# Altium PCB DB30.PcbDoc (part 4 of 8)
Units mil, origin at the board's own origin, x right, y up, seen from the top; angles counter-clockwise.
Board outline 3236.22 x 4456.69 mil, 8 copper layers (Top Layer, MidLayer1, MidLayer2, GND-Layer5, MidLayer3, VCC, MidLayer4, Bottom Layer), stack 61.8 mil thick; 219 components, 472 nets, 1811 pads, 1561 vias.
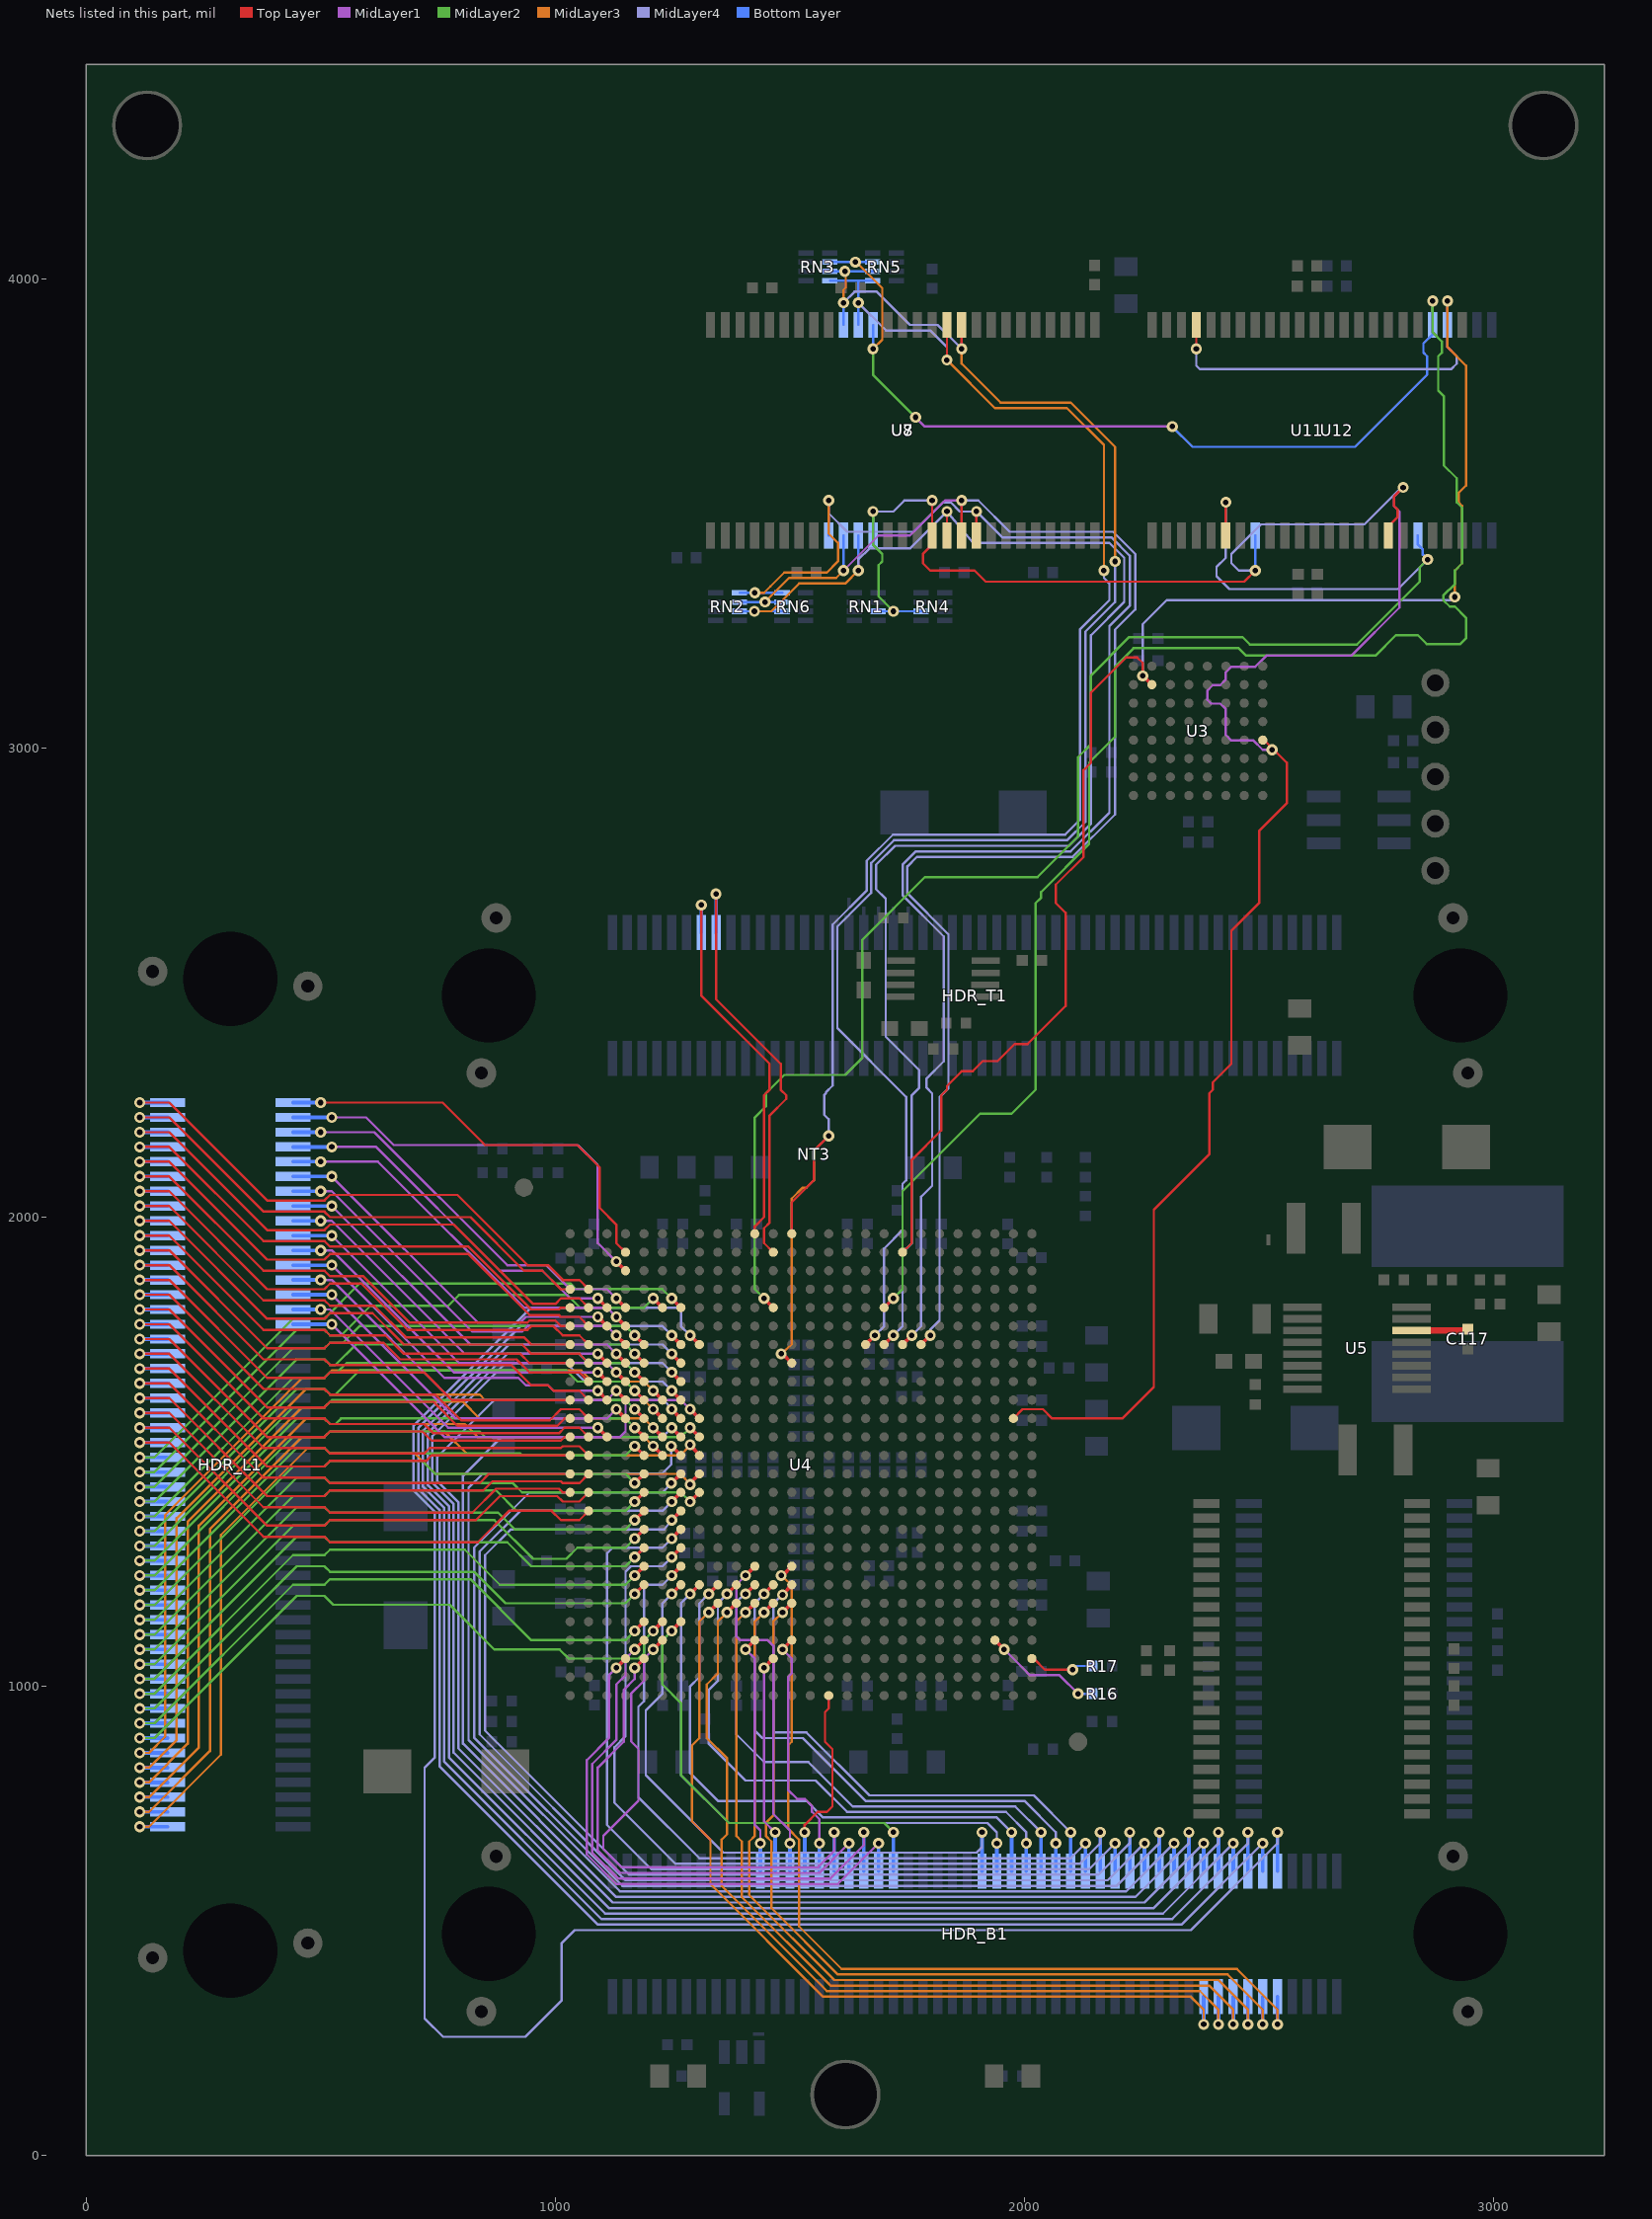
[diagram p10: the nets of this part, all layers, seen from the top]

## Via types
v1: diameter 23.62, hole 11.81, Top Layer to Bottom Layer, 944 vias
v2: diameter 23.62, hole 11.81, Top Layer to Bottom Layer, tented both sides, 477 vias
v3: diameter 27.56, hole 15.75, Top Layer to Bottom Layer, 139 vias
v4: diameter 23.62, hole 11.81, Top Layer to Bottom Layer, tented top, 1 vias

## Nets (pads, with @x,y where several pads share a name; then routed paths per layer and width w, separated by ;. In a path a pad name is that pad's centre, name@x,y a point inside that pad or via, vN(x,y) a via of type N, cw(c..) or ccw(c..) an arc to the next point about the centre after c; other vN are vias at no path point) (continued)
BUS_NBE3: RN3.6 RN5.7 U4.E18 U8.39 U12.40 | length 5096.7
  Top Layer w7.87: U4.E18@1700.79,1807.09 v1(1720.47,1826.77)
  MidLayer1 w5: v2(1767.72,3704.72) 1787.4,3685.04 v2(2314.96,3685.04)
  MidLayer2 w5: v2(1677.17,3850.39) 1677.17,3795.28 v2(1767.72,3704.72) ; v1(1720.47,1826.77) 1740.16,1846.46 1740.16,2027.56 1740.16,2039.37 1740.16,2055.12 1905.51,2220.47 1972.44,2220.47 2023.62,2271.65 2023.62,2669.29 2035.43,2681.1 2035.43,2692.91 2137.8,2795.28 2137.8,2968.5 2192.91,3023.62 2192.91,3173.23 2232.28,3212.6 2456.69,3212.6 2472.44,3196.85 2748.03,3196.85 2791.34,3240.16 2838.58,3240.16 2857.28,3221.46 2929.13,3221.46 2940.94,3233.27 2940.94,3277.56 2917.32,3301.18 2906.5,3301.18 2892.72,3314.96 2892.72,3324.8 2917.32,3349.41 2917.32,3377.95 2933.07,3393.7 2933.07,3511.81 2921.26,3523.62 2921.26,3574.8 2893.7,3602.36 2893.7,3750 2881.89,3761.81 2881.89,3834.65 2889.76,3842.52 2889.76,3866.14 2870.08,3885.83 v2(2870.08,3952.76)
  MidLayer3 w5: v1@1641.54,4035.43 1696.85,3980.12 1696.85,3870.08 v2(1677.17,3850.39)
  Bottom Layer w5: RN3.6@1586.22,4035.43 RN5.7@1677.56,4035.43 ; v2(1677.17,3850.39) U8.39@1677.17,3901.57 ; v2(2314.96,3685.04) 2358.27,3641.73 2704.72,3641.73 2858.27,3795.28 2858.27,3834.65 2850.39,3842.52 2850.39,3862.2 2870.08,3881.89 v2(2870.08,3952.76)
  other v1: 1639.78,4035.43
BUS_NOE: U3.G2 U4.B19 U11.41 U12.41 | length 3948.6
  Top Layer w5: U4.B19@1740.16,1925.2 1759.84,1944.88 1759.84,2027.56 1759.84,2039.37 1759.84,2122.05 1822.83,2185.04 1822.83,2259.84 1834.64,2271.65 1834.64,2279.53 1866.14,2311.02 1889.76,2311.02 1911.17,2332.43 1942.66,2332.43 1978.9,2368.66 2006.46,2368.66 2087.6,2449.8 2087.6,2648.62 2066.93,2669.29 2066.93,2708.66 2125.98,2767.72 2125.98,2952.76 2141.73,2968.5 2141.73,3118.11 2216.54,3192.91 2240.16,3192.91 2251.97,3181.1 v1@2251.97,3154.53 ; v1@2255.91,3150.59 v1@2255.91,3154.53 ; v2(2366.14,3850.39) U11.41@2366.14,3901.57
  Top Layer w7.87: v1@2251.97,3154.53 U3.G2@2271.65,3134.84
  MidLayer3 w5: v2(2901.58,3952.76) 2901.57,3854.33 2940.94,3814.96 2940.94,3559.06 2925.2,3543.31 2925.2,3523.62 2933.07,3515.75 2933.07,3393.7 2917.32,3377.95 2917.32,3314.96 v1(2917.32,3321.85)
  MidLayer4 w5: v1(2251.97,3153.54) 2251.97,3263.78 2303.15,3314.96 2907.48,3314.96 v1(2917.32,3321.85) ; v2(2366.14,3850.39) 2366.14,3814.96 2374.02,3807.09 2909.45,3807.09 2921.26,3818.9 2921.26,3834.65 2901.58,3854.33 v2(2901.58,3952.76)
  Bottom Layer w5: U12.41@2901.57,3901.57 v2(2901.58,3952.76)
BUS_NWE: RN1.7 RN4.6 U3.A5 U4.L25 U7.16 U8.16 U11.17 U12.17 | length 4955.5
  Top Layer w5: U7.16@1803.14,3452.75 v2(1803.14,3527.55) ; U7.16@1803.15,3460.62 1803.15,3433.07 1783.46,3413.39 1783.46,3393.7 1799.21,3377.95 1893.7,3377.95 1917.32,3354.33 2468.5,3354.33 v1(2492.13,3377.95) ; U4.L25@1976.38,1570.87 1996.06,1590.55 2039.37,1590.55 2059.06,1570.87 2078.74,1570.87 2094.49,1570.87 2208.66,1570.87 2275.59,1637.8 2275.59,2015.75 2393.7,2133.86 2393.7,2263.78 2401.57,2271.65 2401.57,2287.4 2440.94,2326.77 2440.94,2610.24 2500,2669.29 2500,2822.83 2559.06,2881.89 2559.06,2968.5 2510.82,3016.74 U3.A5@2507.87,3016.73 ; U11.17@2775.59,3452.76 2775.59,3472.44 2795.28,3492.13 2795.28,3507.87 2787.4,3515.75 2787.4,3535.43 v1(2807.09,3555.12)
  MidLayer1 w5: v1(2527.56,2996.06) 2507.87,2996.06 2488.19,3015.75 2440.94,3015.75 2429.13,3027.56 2429.13,3082.68 2417.32,3094.49 2397.64,3094.49 2389.76,3102.36 2389.76,3122.05 2401.57,3133.86 2417.32,3133.86 2429.13,3145.67 2429.13,3161.42 2440.94,3173.23 2492.13,3173.23 2515.75,3196.85 2696.85,3196.85 2799.21,3299.21 2799.21,3503.94 2787.4,3515.75 2787.4,3535.43 v1(2807.09,3555.12)
  MidLayer2 w5: v2(1677.17,3503.94) 1677.17,3433.07 1696.85,3413.39 1696.85,3397.64 1688.98,3389.76 1688.98,3322.83 v1(1720.47,3291.34)
  MidLayer4 w5: v2(1677.17,3503.94) 1720.47,3503.94 1744.09,3527.55 v2(1803.14,3527.55) ; v1(2492.13,3377.95) 2456.69,3377.95 2440.94,3393.7 2440.94,3413.39 2503.94,3476.38 2724.41,3476.38 v1@2805.12,3557.09
  Bottom Layer w5: U8.16@1677.17,3452.76 v2(1677.17,3503.94) ; RN1.7@1688.18,3291.34 RN4.6@1779.53,3291.34 RN4.6@1779.92,3291.34 ; v1(2492.13,3377.95) U12.17@2492.13,3452.76
BUS_SDRAM_CKE: RN3.7 RN5.6 U4.G17 U7.37 U8.37 | length 3474.1
  Top Layer w5: v2(1866.14,3850.39) U7.37@1866.14,3901.57
  Top Layer w7.87: U4.G17@1661.42,1728.35 v1(1681.1,1748.03)
  MidLayer3 w5: v2(1614.17,3948.82) 1614.17,3976.38 1618.9,3981.11 v1@1618.9,4015.75 ; v2(1866.14,3850.39) 1866.14,3818.9 1948.82,3736.22 2098.43,3736.22 2192.91,3641.73 v1(2192.91,3397.64)
  MidLayer4 w5: v2(1614.17,3948.82) 1637.8,3972.44 1685.04,3972.44 1755.91,3901.57 1814.96,3901.57 v2(1866.14,3850.39) ; v1(1681.1,1748.03) 1700.79,1767.72 1700.79,1933.07 1740.16,1972.44 1740.16,2027.56 1740.16,2043.31 1740.16,2070.87 1748.03,2078.74 1748.03,2255.91 1601.2,2402.74 1601.2,2619.25 1673.05,2691.1 1673.5,2691.1 1673.5,2754.96 1721.69,2803.15 2090.55,2803.15 2129.92,2842.52 2129.92,3248.03 2192.91,3311.02 v1(2192.91,3397.64)
  Bottom Layer w5: RN3.7@1586.22,4015.75 RN5.6@1676.19,4015.75 RN5.6@1677.56,4015.75 ; U8.37@1614.17,3901.57 v2(1614.17,3948.82)
  other v1: 1617.14,4015.75
BUS_SDRAM_CLK: NT3.2 RN3.8 RN5.5 U4.H13 U7.38 U8.38 | length 3458.8
  Top Layer w5: NT3.2@1551.18,2141.73 1562.99,2153.54 v1(1582.68,2173.23) ; v2(1834.64,3826.77) U7.38@1834.65,3901.57
  Top Layer w7.87: v1@1484.25,1708.66 U4.H13@1503.94,1688.98
  MidLayer3 w5: v1(1481.3,1708.66) 1503.94,1728.35 1503.94,2027.56 1503.94,2039.37 1527.56,2062.99 1535.43,2062.99 1551.18,2078.74 1551.18,2141.73 v1(1582.68,2173.23) ; v2(1834.64,3826.77) 1937,3724.41 2090.55,3724.41 2169.29,3645.67 v1(2169.29,3377.95)
  MidLayer4 w5: v1(1582.68,2173.23) 1582.68,2208.66 1573,2218.34 1573,2260.09 1576.99,2264.08 1576.99,2266.23 1591.2,2280.43 1591.2,2623.39 1663.5,2695.69 1663.5,2759.1 1719.36,2814.96 2086.61,2814.96 2118.11,2846.46 2118.11,3251.97 2181.1,3314.96 2181.1,3350.39 2169.29,3362.2 v1(2169.29,3377.95) ; v2(1645.67,3948.82) 1704.72,3889.76 1799.21,3889.76 1834.64,3854.34 v2(1834.64,3826.77)
  Bottom Layer w5: RN3.8@1586.22,3996.06 RN5.5@1677.56,3996.06 ; U8.38@1645.67,3901.57 1645.67,3996.06
BUS_SDRAM_FEEDBACK: NT3.1 U4.A13 | length 181
  Top Layer w5: U4.A13@1503.94,1964.57 1503.94,2031.5 1551.18,2078.74 NT3.1@1551.18,2125.98
BUS_SDRAM_NCAS: RN2.7 RN6.6 U4.G18 U7.17 U8.17 | length 3334.5
  Top Layer w5: U7.17@1834.65,3452.76 1834.64,3499.99 v1(1834.65,3503.94)
  Top Layer w7.87: U4.G18@1700.79,1728.35 v1(1720.47,1748.03)
  MidLayer3 w5: v1(1424.23,3291.34) 1460.63,3291.34 1519.68,3350.39 1618.11,3350.39 v2(1645.67,3377.95)
  MidLayer4 w5: v2(1645.67,3377.95) 1645.67,3401.57 1669.29,3425.2 1755.91,3425.2 v1(1834.65,3503.94) 1890.42,3437.01 2181.1,3437.01 2212.6,3405.51 2212.6,3311.02 2141.73,3240.16 2141.73,2838.58 2094.49,2791.34 1724.02,2791.34 1683.5,2750.82 1683.5,2699.24 1704.26,2678.48 1704.26,2384.54 1775.59,2313.21 1775.59,2275.59 1759.84,2259.84 1759.84,2043.31 1759.84,2027.56 1759.84,1944.88 1740.16,1925.2 1740.16,1767.72 v1(1720.47,1748.03)
  Bottom Layer w5: RN2.7@1393.3,3291.34 RN6.6@1483.28,3291.34 RN6.6@1484.64,3291.34 ; v2(1645.67,3377.95) U8.17@1645.67,3452.76
BUS_SDRAM_NCS: RN2.5 RN6.8 U4.G19 U7.19 U8.19 | length 3476.3
  Top Layer w5: U7.19@1897.64,3452.76 v2(1897.63,3503.93)
  Top Layer w7.87: U4.G19@1740.16,1728.35 v1(1759.84,1748.03)
  MidLayer3 w5: v1(1425.2,3330.71) 1444.88,3330.71 1458.54,3344.36 1488.19,3374.02 1578.74,3374.02 1602.36,3397.64 1602.36,3437.01 1582.68,3456.69 v2(1582.68,3527.56)
  MidLayer4 w5: v2(1582.68,3527.56) 1582.68,3500 1622.05,3460.63 1763.78,3460.63 1826.77,3523.62 1842.52,3523.62 1862.21,3503.93 v2(1897.63,3503.93) 1952.76,3448.82 2185.04,3448.82 2224.41,3409.45 2224.41,3303.15 2181.1,3259.84 2181.1,2862.2 2098.43,2779.53 1768.23,2779.53 1740.3,2751.6 1740.3,2685.86 1827.88,2598.27 1827.88,2332.12 1791.34,2295.57 1791.34,2275.59 1803.15,2263.78 1803.15,2066.93 1779.53,2043.31 1779.53,2027.56 1779.53,1767.72 v1(1759.84,1748.03)
  Bottom Layer w5: RN2.5@1393.31,3330.71 RN6.8@1483.28,3330.71 RN6.8@1484.26,3330.71 ; U8.19@1582.68,3452.76 v2(1582.68,3527.56)
BUS_SDRAM_NRAS: RN2.6 RN6.7 U4.G20 U7.18 U8.18 | length 3317.2
  Top Layer w5: U7.18@1866.14,3452.76 v1(1866.14,3527.55)
  Top Layer w7.87: U4.G20@1779.53,1728.35 v1(1799.21,1748.03)
  MidLayer1 w5: v2(1614.17,3377.95) 1688.98,3452.76 1755.91,3452.76 1830.7,3527.55 v1(1866.14,3527.55)
  MidLayer3 w5: v1(1446.86,3311.02) 1498.05,3362.2 1598.43,3362.2 v2(1614.17,3377.95)
  MidLayer4 w5: v1(1799.21,1748.03) 1799.21,1760.01 1818.9,1779.7 1818.9,2027.56 1818.9,2043.31 1818.9,2255.91 1837.88,2274.89 1837.88,2602.42 1750.3,2690 1750.3,2747.46 1770.56,2767.72 2102.36,2767.72 2192.91,2858.27 2192.91,3251.97 2236.22,3295.28 2236.22,3413.39 2188.98,3460.63 1968.5,3460.63 1901.58,3527.55 v1(1866.14,3527.55) v1@1858.27,3531.5
  Bottom Layer w5: RN2.6@1393.3,3311.02 RN6.7@1483.28,3311.03 RN6.7@1484.64,3311.02 ; v2(1614.17,3377.95) U8.18@1614.17,3452.76
BUS_SRAM_NCS: U4.E12 U11.6 U12.6 | length 3511.7
  Top Layer w5: U11.6@2429.13,3452.76 2429.13,3503.94 v2(2429.13,3523.62)
  Top Layer w7.87: v1(1444.88,1826.77) U4.E12@1464.57,1807.09
  MidLayer2 w5: v1(1444.88,1826.77) 1425.2,1846.46 1425.2,2027.56 1425.2,2039.37 1425.2,2212.6 1448.82,2236.22 1448.82,2244.09 1448.82,2263.78 1488.19,2303.15 1618.11,2303.15 1654.53,2339.57 1654.53,2591.54 1787.4,2724.41 2027.56,2724.41 2114.17,2811.02 2114.17,2980.32 2141.73,3007.87 2141.73,3154.53 2223.42,3236.22 2464.57,3236.22 2480.32,3220.47 2708.66,3220.47 2842.52,3354.33 2842.52,3384.83 v2(2859.27,3401.57)
  MidLayer4 w5: v2(2429.13,3523.62) 2429.13,3405.51 2409.45,3385.83 2409.45,3366.14 2437.01,3338.58 2796.28,3338.58 v2(2859.27,3401.57)
  Bottom Layer w5: U12.6@2838.58,3452.76 2838.58,3433.42 2848.92,3423.08 2848.92,3411.92 v2(2859.27,3401.57)
BUZZER: HDR_B1.40 U4.AB7 | length 945.4
  Top Layer w7.87: v1(1248.03,1118.11) U4.AB7@1267.72,1137.8
  MidLayer2 w5: v1(1248.03,1118.11) 1228.35,1098.42 1228.35,1003.94 1267.72,964.57 1267.72,917.32 1267.72,905.51 1267.72,811.02 1370.08,708.66 1700.79,708.66 v2(1720.47,688.98)
  Bottom Layer w7.87: HDR_B1.40@1720.48,606.3 v2(1720.47,688.98)
CAN_RXD: HDR_T1.14 U4.A11 | length 833.2
  Top Layer w5: v2(1311.02,2665.35) 1311.02,2472.44 1456.69,2326.77 1456.69,2271.65 1444.88,2259.84 1444.88,2062.99 1444.88,2039.37 1444.88,2027.56 1444.88,2000 1425.2,1980.31 U4.A11@1425.2,1964.57
  Bottom Layer w7.87: HDR_T1.14@1311.02,2606.3 v2(1311.02,2665.35)
CAN_TXD: HDR_T1.16 U4.B12 | length 936.1
  Top Layer w5: v2(1342.52,2688.98) 1342.52,2464.57 1480.31,2326.77 1480.31,2271.65 1492.13,2259.84 1492.13,2251.97 1456.69,2216.54 1456.69,2039.37 1456.69,2027.56 1456.69,1988.19 1444.88,1976.38 1444.88,1944.88 U4.B12@1464.57,1925.2
  Bottom Layer w7.87: HDR_T1.16@1342.52,2606.3 v2(1342.52,2688.98)
CCLK: R17.2 U4.AD26 | length 152.6
  Top Layer w5: U4.AD26@2015.75,1059.05 2019.69,1059.05 2043.31,1035.43 v1(2102.36,1035.43)
  Bottom Layer w5: v1(2102.36,1035.43) 2110.24,1043.31 R17.2@2144.17,1043.31 R17.2@2136.3,1035.43
COMP: C117.2 U5.6 | length 121.4
  Top Layer w13.78: U5.6@2824.58,1758.25 2942.3,1758.25 C117.2@2944.88,1760.82
DAU_RESET_SW: HDR_B1.38 U4.AD4 | length 1194.6
  Top Layer w7.87: v1(1129.92,1039.37) U4.AD4@1149.61,1059.05
  MidLayer1 w5: v1(1129.92,1039.37) 1114.17,1023.62 1114.17,917.32 1114.17,905.51 1114.17,889.76 1066.93,842.52 1066.93,641.73 1129.92,578.74 1602.36,578.74 v2(1688.98,665.35)
  Bottom Layer w7.87: HDR_B1.38@1688.98,606.3 v2(1688.98,665.35)
DAU_TFT_BLIGHT: HDR_B1.91 U4.W13 | length 1982.9
  Top Layer w7.87: v1@1484.25,1236.22 U4.W13@1503.94,1255.91
  MidLayer3 w5: v1(1481.3,1236.22) 1503.94,1216.54 1503.94,917.32 1503.94,905.51 1503.94,881.89 1496.06,874.02 1496.06,696.85 1519.68,673.23 1519.68,488.19 1610.24,397.64 2452.76,397.64 2539.37,311.02 v2(2539.37,279.53)
  Bottom Layer w7.87: v2(2539.37,279.53) HDR_B1.91@2539.37,338.58
DAU_TFT_BLUE0: HDR_B1.62 U4.Y12 | length 1141.4
  Top Layer w7.87: v1(1444.88,1196.85) U4.Y12@1464.57,1216.54
  MidLayer4 w5: v1(1444.88,1196.85) 1425.19,1177.16 1425.19,917.32 1425.2,905.51 1440.94,889.76 1527.56,889.76 1661.42,755.91 2000,755.91 2066.93,688.98 v2(2066.93,665.35)
  Bottom Layer w7.87: HDR_B1.62@2066.93,606.3 v2(2066.93,665.35)
DAU_TFT_BLUE1: HDR_B1.64 U4.Y13 | length 1133.6
  Top Layer w7.87: v1(1484.25,1194.88) U4.Y13@1503.94,1216.54
  MidLayer4 w5: v1(1484.25,1194.88) 1464.57,1177.16 1464.57,917.32 1464.57,905.51 1468.5,901.57 1535.43,901.57 1669.29,767.72 2019.68,767.72 v2(2098.42,688.98)
  Bottom Layer w7.87: v2(2098.42,688.98) HDR_B1.64@2098.43,606.3
DAU_TFT_BLUE2: HDR_B1.66 U4.W7 | length 1626.8
  Top Layer w7.87: v1(1248.03,1236.22) U4.W7@1267.72,1255.91
  MidLayer4 w5: v1(1248.03,1236.22) 1228.34,1216.53 1196.85,1216.53 1188.98,1208.66 1188.98,968.5 1177.17,956.69 1177.17,917.32 1177.17,905.51 1177.17,763.78 1307.09,633.86 2098.43,633.86 v2(2129.92,665.35)
  Bottom Layer w7.87: HDR_B1.66@2129.92,606.3 v2(2129.92,665.35)
DAU_TFT_BLUE3: HDR_B1.68 U4.V7 | length 1854.7
  Top Layer w7.87: v1(1248.03,1275.59) U4.V7@1267.72,1295.28
  MidLayer4 w5: v1(1248.03,1275.59) 1228.34,1255.9 1161.42,1255.9 1149.61,1244.09 1149.61,917.32 1149.61,905.51 1149.61,893.7 1125.98,870.08 1125.98,751.97 1255.91,622.05 2118.11,622.05 2161.42,665.35 v2(2161.42,688.98)
  Bottom Layer w7.87: HDR_B1.68@2161.42,606.3 v2(2161.42,688.98)
DAU_TFT_BLUE4: HDR_B1.70 U4.U7 | length 1961.1
  Top Layer w7.87: v1(1248.03,1314.96) U4.U7@1267.72,1334.65
  MidLayer4 w5: v1(1248.03,1314.96) 1228.35,1295.28 1122.05,1295.28 1110.24,1283.46 1110.24,917.32 1110.24,905.51 1110.24,704.72 1204.72,610.24 2137.8,610.24 v2(2192.91,665.35)
  Bottom Layer w7.87: HDR_B1.70@2192.92,606.3 v2(2192.91,665.35)
DAU_TFT_CL1: HDR_B1.88 U4.H7 | length 3391.7
  Top Layer w7.87: v1(1248.03,1708.66) U4.H7@1267.72,1688.98
  MidLayer4 w5: v1(1248.03,1708.66) 1228.34,1728.35 968.5,1728.35 956.69,1728.35 901.57,1728.35 717.9,1544.67 717.9,1425.57 763.15,1380.32 763.15,839.21 1098.43,503.94 2314.96,503.94 2476.38,665.35 v2(2476.38,688.98)
  Bottom Layer w7.87: HDR_B1.88@2476.38,606.3 v2(2476.38,688.98)
DAU_TFT_CL2: HDR_B1.90 U4.G7 | length 3490.1
  Top Layer w7.87: v1(1248.03,1748.03) U4.G7@1267.72,1728.35
  MidLayer4 w5: v1(1248.03,1748.03) 1228.34,1767.72 968.51,1767.72 956.69,1767.72 925.2,1767.72 707.9,1550.42 707.9,1421.43 753.15,1376.18 753.15,829.53 1090.55,492.13 2334.65,492.13 v2(2507.87,665.35)
  Bottom Layer w7.87: v2(2507.87,665.35) HDR_B1.90@2507.88,606.3 v2(2507.87,665.35)
DAU_TFT_CL3: HDR_B1.92 U4.G8 | length 4238.6
  Top Layer w7.87: v1(1287.4,1748.03) U4.G8@1307.09,1728.35
  MidLayer4 w5: v1(1287.4,1748.03) 1267.71,1767.72 1267.71,1799.21 1259.84,1807.09 968.5,1807.09 956.69,1807.09 948.82,1807.09 697.9,1556.17 697.9,1417.29 743.15,1372.04 743.15,848.46 721.46,826.77 721.46,292.32 760.83,252.95 936.02,252.95 1013.78,330.71 1013.78,452.76 1041.34,480.32 2354.33,480.32 2539.37,665.35 v2(2539.37,688.98)
  Bottom Layer w7.87: HDR_B1.92@2539.37,606.3 v2(2539.37,688.98)
DAU_TFT_DISP_ON: HDR_B1.89 U4.AA13 | length 1904.8
  Top Layer w7.87: v1(1484.25,1157.48) U4.AA13@1503.94,1177.17
  MidLayer3 w5: v1(1484.25,1157.48) 1464.57,1137.79 1464.57,917.32 1464.57,905.51 1464.57,724.41 1448.82,708.66 1448.82,681.1 1460.63,669.29 1460.63,527.56 1602.36,385.83 2433.07,385.83 2507.87,311.02 v2(2507.88,279.53)
  Bottom Layer w7.87: v2(2507.88,279.53) HDR_B1.89@2507.88,338.58
DAU_TFT_GREEN0: HDR_B1.72 U4.T7 | length 2467
  Top Layer w7.87: v1(1248.03,1354.33) U4.T7@1267.72,1374.02
  MidLayer4 w5: v1(1248.03,1354.33) 1232.28,1334.65 1078.74,1334.64 968.5,1334.64 956.69,1334.65 905.51,1334.65 850.39,1279.53 850.39,905.51 1157.48,598.43 2157.48,598.43 2224.41,665.36 v2(2224.41,688.98)
  Bottom Layer w7.87: HDR_B1.72@2224.41,606.3 v2(2224.41,688.98)
DAU_TFT_GREEN1: HDR_B1.74 U4.R7 | length 2508.9
  Top Layer w7.87: v1(1248.03,1393.7) U4.R7@1267.72,1413.39
  MidLayer4 w5: v1(1248.03,1393.7) 1228.34,1374.01 1059.06,1374.01 968.5,1374.01 956.69,1374.02 925.2,1374.02 838.58,1287.4 838.58,897.64 1149.61,586.61 2177.16,586.61 v2(2255.9,665.35)
  Bottom Layer w7.87: HDR_B1.74@2255.91,606.3 v2(2255.9,665.35)
DAU_TFT_GREEN2: HDR_B1.76 U4.P7 | length 2646
  Top Layer w7.87: v1@1248.03,1433.07 U4.P7@1267.72,1452.76
  MidLayer4 w5: v1@1248.03,1433.07 1247.54,1432.58 1228.34,1413.38 968.5,1413.39 956.69,1413.39 944.88,1413.39 826.77,1295.28 826.77,890.75 1142.72,574.8 2196.85,574.8 2287.4,665.35 v2(2287.4,688.98)
  Bottom Layer w7.87: HDR_B1.76@2287.41,606.3 v2(2287.4,688.98)
  other v1: 1247.05,1433.07
DAU_TFT_GREEN3: HDR_B1.78 U4.N7 | length 2796.4
  Top Layer w7.87: v1@1248.03,1511.81 U4.N7@1267.72,1492.13
  MidLayer4 w5: v1(1247.05,1511.81) 1247.05,1473.05 1227,1453 844.96,1453 814.96,1423 814.96,885.83 1137.8,562.99 2216.53,562.99 v2(2318.9,665.35) ; v1@1247.54,1512.3 v1@1248.03,1511.81
  Bottom Layer w7.87: HDR_B1.78@2318.9,606.3 v2(2318.9,665.35)
DAU_TFT_GREEN4: HDR_B1.80 U4.M7 | length 2922.2
  Top Layer w7.87: v1(1248.03,1551.18) U4.M7@1267.72,1531.5
  MidLayer4 w5: v1(1248.03,1551.18) 1228.34,1531.5 885.83,1531.5 803.15,1448.82 803.15,877.95 1129.92,551.18 2236.22,551.18 2350.39,665.35 v2(2350.39,688.98)
  Bottom Layer w7.87: HDR_B1.80@2350.4,606.3 v2(2350.39,688.98)
DAU_TFT_GREEN5: HDR_B1.82 U4.L7 | length 3062.8
  Top Layer w7.87: v1(1248.03,1590.55) U4.L7@1267.72,1570.87
  MidLayer4 w5: v1(1248.03,1590.55) 1232.28,1610.24 1078.74,1610.24 968.5,1610.24 956.69,1610.24 870.08,1610.24 747.9,1488.06 747.9,1438 793.15,1392.75 793.15,868.27 1122.05,539.37 2255.9,539.37 v2(2381.89,665.35)
  Bottom Layer w7.87: HDR_B1.82@2381.89,606.3 v2(2381.89,665.35)
DAU_TFT_IRQ: HDR_B1.81 U4.AA9 | length 1890.2
  Top Layer w7.87: v1(1326.77,1157.48) U4.AA9@1346.46,1177.17
  MidLayer3 w5: v1(1326.77,1157.48) 1307.08,1137.79 1307.09,917.32 1307.09,905.51 1307.09,889.76 1291.34,874.02 1291.34,712.6 1330.71,673.23 1330.71,578.74 1570.87,338.58 2354.33,338.58 2381.89,311.02 v2(2381.89,279.53)
  Bottom Layer w7.87: v2(2381.89,279.53) HDR_B1.81@2381.89,338.58
DAU_TFT_M: HDR_B1.87 U4.AA12 | length 1897.9
  Top Layer w7.87: v1(1444.88,1157.48) U4.AA12@1464.57,1177.17
  MidLayer3 w5: v1(1444.88,1157.48) 1425.2,1137.79 1425.2,917.32 1425.2,905.51 1425.2,681.1 1413.39,669.29 1413.39,555.12 1594.49,374.02 2413.39,374.02 2476.38,311.02 v2(2476.38,279.53)
  Bottom Layer w7.87: v2(2476.38,279.53) HDR_B1.87@2476.38,338.58
DAU_TFT_MUX: HDR_B1.85 U4.AA11 | length 1884.5
  Top Layer w7.87: v1(1405.51,1157.48) U4.AA11@1425.2,1177.17
  MidLayer3 w5: v1(1405.51,1157.48) 1385.83,1137.79 1385.83,917.32 1385.83,905.51 1385.83,681.1 1397.64,669.29 1397.64,551.18 1586.61,362.2 2393.7,362.2 2444.88,311.02 v2(2444.88,279.53)
  Bottom Layer w7.87: v2(2444.88,279.53) HDR_B1.85@2444.89,338.58
DAU_TFT_POL: HDR_B1.83 U4.AA10 | length 1910.2
  Top Layer w7.87: v1(1366.14,1157.48) U4.AA10@1385.83,1177.17
  MidLayer3 w5: v1(1366.14,1157.48) 1346.46,1137.79 1346.46,1027.56 1322.83,1003.94 1322.83,917.32 1322.83,905.51 1322.83,889.76 1366.14,846.46 1366.14,685.04 1354.33,673.23 1354.33,574.8 1578.74,350.39 2374.02,350.39 2413.39,311.03 v2(2413.39,279.53)
  Bottom Layer w7.87: v2(2413.39,279.53) HDR_B1.83@2413.39,338.58
DAU_TFT_RED0: HDR_B1.52 U4.Y7 | length 1340.6
  Top Layer w7.87: v1(1248.03,1196.85) U4.Y7@1267.72,1216.54
  MidLayer4 w5: v1(1248.03,1196.85) 1228.34,1177.16 1228.34,984.25 1192.91,948.82 1192.91,917.32 1192.91,905.51 1192.91,811.02 1358.27,645.67 1897.64,645.67 1909.45,657.48 v2(1909.45,688.98)
  Bottom Layer w7.87: HDR_B1.52@1909.45,606.3 v2(1909.45,688.98)
DAU_TFT_RED1: HDR_B1.54 U4.Y8 | length 1228.3
  Top Layer w7.87: v1(1287.4,1196.85) U4.Y8@1307.09,1216.54
  MidLayer4 w5: v1(1287.4,1196.85) 1267.71,1177.16 1267.72,917.32 1267.72,905.51 1267.72,811.02 1370.08,708.66 1921.26,708.66 1940.94,688.98 v2(1940.94,665.35)
  Bottom Layer w7.87: HDR_B1.54@1940.95,606.3 v2(1940.94,665.35)
DAU_TFT_RED2: HDR_B1.56 U4.Y9 | length 1245.9
  Top Layer w7.87: v1(1326.77,1196.85) U4.Y9@1346.46,1216.54
  MidLayer4 w5: v1(1326.77,1196.85) 1307.08,1177.16 1307.08,1019.69 1287.4,1000 1287.4,917.32 1287.4,905.51 1287.4,814.96 1346.46,755.91 1535.43,755.91 1570.87,720.47 1940.94,720.47 v2(1972.44,688.98)
  Bottom Layer w7.87: HDR_B1.56@1972.44,606.3 v2(1972.44,688.98)
DAU_TFT_RED3: HDR_B1.58 U4.Y10 | length 1201.2
  Top Layer w7.87: v1(1366.14,1196.85) U4.Y10@1385.83,1216.54
  MidLayer4 w5: v1(1366.14,1196.85) 1346.46,1177.16 1346.46,1011.81 1326.77,992.13 1326.77,917.32 1326.77,905.51 1326.77,877.95 1405.51,799.21 1555.12,799.21 1622.05,732.28 1960.63,732.28 2003.94,688.98 v2(2003.94,665.35)
  Bottom Layer w7.87: HDR_B1.58@2003.94,606.3 v2(2003.94,665.35)
DAU_TFT_RED4: HDR_B1.60 U4.Y11 | length 1155.2
  Top Layer w7.87: v1(1405.51,1196.85) U4.Y11@1425.2,1216.54
  MidLayer4 w5: v1(1405.51,1196.85) 1385.83,1181.1 1385.82,1027.56 1385.82,917.32 1385.83,905.51 1385.83,897.64 1444.88,838.58 1539.37,838.58 1633.86,744.09 1980.31,744.09 v2(2035.43,688.98)
  Bottom Layer w7.87: HDR_B1.60@2035.44,606.3 v2(2035.43,688.98)
DAU_TFT_STH: HDR_B1.86 U4.J7 | length 3274.1
  Top Layer w7.87: v1(1248.03,1669.29) U4.J7@1267.72,1649.61
  MidLayer4 w5: v1(1248.03,1669.29) 1228.34,1688.98 1070.87,1688.98 1051.18,1708.66 968.5,1708.66 956.69,1708.66 897.64,1708.66 727.9,1538.93 727.9,1429.72 773.15,1384.47 773.15,848.9 1106.3,515.75 2295.28,515.75 v2(2444.88,665.35)
  Bottom Layer w7.87: HDR_B1.86@2444.89,606.3 v2(2444.88,665.35)
DAU_TFT_STV: HDR_B1.84 U4.K7 | length 3251
  Top Layer w7.87: v1(1248.03,1629.92) U4.K7@1267.72,1610.24
  MidLayer4 w5: v1(1248.03,1629.92) 1228.35,1649.61 1062.99,1649.61 1023.62,1688.98 968.5,1688.98 956.69,1688.98 893.7,1688.98 771.18,1566.45 737.9,1533.18 737.9,1433.86 783.15,1388.61 783.15,858.58 1114.17,527.56 2275.59,527.56 2413.38,665.35 v2(2413.38,688.98)
  Bottom Layer w7.87: HDR_B1.84@2413.39,606.3 v2(2413.38,688.98)
DIP0: HDR_B1.22 U4.AC11 | length 513.3
  Top Layer w7.87: v1(1405.51,1078.74) U4.AC11@1425.2,1098.43
  MidLayer1 w5: v1(1405.51,1078.74) 1425.19,1059.05 1425.19,917.32 1425.2,905.51 1425.2,704.72 1437.01,692.91 v2(1437.01,665.35)
  Bottom Layer w7.87: HDR_B1.22@1437.01,606.3 v2(1437.01,665.35)
DIP1: HDR_B1.24 U4.AD12 | length 470.7
  Top Layer w7.87: v1(1444.88,1039.37) U4.AD12@1464.57,1059.05
  MidLayer1 w5: v1(1444.88,1039.37) 1444.88,893.7 1444.88,712.6 v2(1468.5,688.98)
  Bottom Layer w7.87: HDR_B1.24@1468.51,606.3 v2(1468.5,688.98)
DIP2: HDR_B1.26 U4.W11 | length 747.8
  Top Layer w7.87: v1(1405.51,1236.22) U4.W11@1425.2,1255.91
  MidLayer1 w5: v1(1405.51,1236.22) 1385.83,1216.53 1385.83,1106.3 1393.7,1098.43 1452.76,1098.43 1464.57,1086.61 1464.57,917.32 1464.57,905.51 1464.57,728.35 1500,692.91 v2(1500,665.35)
  Bottom Layer w7.87: HDR_B1.26@1500,606.3 v2(1500,665.35)
DIP3: HDR_B1.28 U4.AF15 | length 419.8
  Top Layer w5: v2(1531.5,688.98) 1531.5,704.72 1559.06,732.28 1578.74,732.28 1590.55,744.09 1590.55,866.14 1574.8,881.89 1574.8,905.51 1574.8,917.32 1574.8,944.88 1582.68,952.76 U4.AF15@1582.68,980.31
  Bottom Layer w7.87: HDR_B1.28@1531.5,606.3 v2(1531.5,688.98)
DIP4: HDR_B1.30 U4.AC13 | length 548.8
  Top Layer w7.87: v1(1484.25,1078.74) U4.AC13@1503.94,1098.43
  MidLayer1 w5: v1(1484.25,1078.74) 1503.94,1059.05 1503.94,1027.56 1496.06,1019.69 1496.06,917.32 1496.06,905.51 1496.06,779.53 1515.75,759.84 1532.13,759.84 1547.56,744.41 ; 1547.24,744.09 1547.24,732.28 1562.99,716.54 v2(1562.99,665.35)
  Bottom Layer w7.87: HDR_B1.30@1562.99,606.3 v2(1562.99,665.35)
DIP5: HDR_B1.32 U4.AC6 | length 1155.3
  Top Layer w7.87: v1(1208.66,1078.74) U4.AC6@1228.35,1098.43
  MidLayer1 w5: v1(1208.66,1078.74) 1188.98,1059.05 1188.98,1011.81 1161.42,984.25 1161.42,917.32 1161.42,905.51 1161.42,882.87 1177.17,867.13 1177.17,755.91 1102.36,681.1 1102.36,653.54 1141.73,614.17 1559.06,614.17 1594.49,649.61 v2(1594.49,688.98)
  Bottom Layer w7.87: HDR_B1.32@1594.49,606.3 v2(1594.49,688.98)
DIP6: HDR_B1.34 U4.AD5 | length 1090.4
  Top Layer w7.87: v1(1169.29,1039.37) U4.AD5@1188.98,1059.05
  MidLayer1 w5: v1(1169.29,1039.37) 1169.29,1015.75 1145.67,992.13 1145.67,917.32 1145.67,905.51 1145.67,881.89 1090.55,826.77 1090.55,649.61 1137.8,602.36 1562.99,602.36 v2(1625.98,665.35)
  Bottom Layer w7.87: HDR_B1.34@1625.99,606.3 v2(1625.98,665.35)
DIP7: HDR_B1.36 U4.AC5 | length 1239.6
  Top Layer w7.87: v1(1169.29,1078.74) U4.AC5@1188.98,1098.43
  MidLayer1 w5: v1(1169.29,1078.74) 1149.61,1059.05 1149.61,1023.62 1129.92,1003.94 1129.92,917.32 1129.92,905.51 1129.92,885.83 1078.74,834.65 1078.74,645.67 1133.86,590.55 1586.61,590.55 1657.48,661.42 v2(1657.48,688.98)
  Bottom Layer w7.87: HDR_B1.36@1657.48,606.3 v2(1657.48,688.98)
DONE: R16.2 U4.AC24 | length 256
  Top Layer w7.87: U4.AC24@1937.01,1098.43 v1(1956.69,1078.74)
  MidLayer1 w5: v1(1956.69,1078.74) 1996.71,1038.72 2011.81,1023.62 2074.8,1023.62 v1(2114.17,984.25)
  Bottom Layer w5: v1(2114.17,984.25) R16.2@2144.17,984.25 R16.2@2145.67,984.25
EXTEND_A0: HDR_L1.1 U4.D2 | length 1190.2
  Top Layer w5: v2(114.17,2244.09) 177.17,2244.09 385.83,2035.43 507.88,2035.43 519.69,2047.24 791.34,2047.24 940.94,1897.64 956.69,1897.64 968.5,1897.64 984.25,1897.64 1015.75,1866.14 1051.18,1866.14 U4.D2@1070.87,1846.46
  Bottom Layer w7.87: v2(114.17,2244.09) HDR_L1.1@173.23,2244.09
EXTEND_A1: HDR_L1.3 U4.D1 | length 1143.8
  Top Layer w5: v2(114.17,2212.6) 153.54,2212.6 ; 137.8,2212.6 177.17,2212.6 377.95,2011.81 507.88,2011.81 519.69,2000 818.9,2000 933.07,1885.83 956.69,1885.83 968.5,1885.83 972.44,1885.83 1011.81,1846.46 U4.D1@1031.5,1846.46
  Bottom Layer w7.87: v2(114.17,2212.6) HDR_L1.3@173.23,2212.6
EXTEND_A2: HDR_L1.5 U4.E2 | length 1209.9
  Top Layer w5: v2(114.17,2181.1) 157.48,2181.1 ; 137.8,2181.1 177.17,2181.1 385.83,1972.44 507.88,1972.44 519.69,1984.25 783.46,1984.25 952.76,1814.96 956.69,1814.96 968.5,1814.96 1000,1814.96 1011.81,1826.77 1051.18,1826.77 U4.E2@1070.87,1807.09
  Bottom Layer w7.87: v2(114.17,2181.1) HDR_L1.5@173.23,2181.1
EXTEND_A3: HDR_L1.7 U4.E1 | length 1137.3
  Top Layer w5: v2(114.17,2149.61) 153.54,2149.61 ; 137.8,2149.61 177.17,2149.61 377.95,1948.82 507.88,1948.82 519.69,1937.01 814.96,1937.01 948.82,1803.15 956.69,1803.15 968.5,1803.15 1007.87,1803.15 1011.81,1807.09 U4.E1@1031.5,1807.09
  Bottom Layer w7.87: v2(114.17,2149.61) HDR_L1.7@173.23,2149.6
EXTEND_A4: HDR_L1.9 U4.F2 | length 1182.5
  Top Layer w5: v2(114.17,2118.11) 149.6,2118.11 ; 137.8,2118.11 177.17,2118.11 385.83,1909.45 507.88,1909.45 519.69,1921.26 814.96,1921.26 944.88,1791.34 956.69,1791.34 968.5,1791.34 1007.87,1791.34 1011.81,1787.4 1015.75,1787.4 1047.24,1787.4 1051.18,1787.4 U4.F2@1070.87,1767.72
  Bottom Layer w7.87: v2(114.17,2118.11) HDR_L1.9@173.23,2118.11
EXTEND_A5: HDR_L1.11 U4.F1 | length 1123.5
  Top Layer w5: v2(114.17,2086.62) 149.61,2086.62 ; 137.8,2086.61 177.17,2086.61 377.95,1885.83 507.88,1885.83 519.69,1874.02 590.55,1874.02 688.98,1775.59 940.94,1775.59 944.88,1779.53 956.69,1779.53 968.5,1779.53 1000,1779.53 1011.81,1767.72 U4.F1@1031.5,1767.72
  Bottom Layer w7.87: v2(114.17,2086.62) HDR_L1.11@173.23,2086.61
EXTEND_A6: HDR_L1.13 U4.G2 | length 1179.2
  Top Layer w5: v2(114.17,2055.12) 149.61,2055.12 ; 137.8,2055.12 177.16,2055.12 385.82,1846.46 507.88,1846.46 519.69,1858.27 586.61,1858.27 685.04,1759.84 940.94,1759.84 948.82,1767.72 956.69,1767.72 968.5,1767.72 996.06,1767.72 1015.75,1748.03 1051.18,1748.03 U4.G2@1070.87,1728.35
  Bottom Layer w7.87: v2(114.17,2055.12) HDR_L1.13@173.23,2055.12
EXTEND_A7: HDR_L1.15 U4.G1 | length 1110.5
  Top Layer w5: v2(114.17,2023.62) 149.61,2023.62 ; 137.8,2023.62 177.16,2023.62 377.95,1822.84 507.88,1822.84 519.69,1811.02 614.17,1811.02 681.1,1744.09 933.07,1744.09 948.82,1728.35 956.69,1728.35 968.5,1728.35 U4.G1@1031.5,1728.35
  Bottom Layer w7.87: v2(114.17,2023.62) HDR_L1.15@173.23,2023.62
EXTEND_A8: HDR_L1.17 U4.H2 | length 1162.9
  Top Layer w5: v2(114.17,1992.13) 149.61,1992.13 ; 137.8,1992.13 177.16,1992.13 385.82,1783.47 507.88,1783.47 519.69,1795.28 610.24,1795.28 677.17,1728.35 929.13,1728.35 948.82,1708.66 956.69,1708.66 968.5,1708.66 1051.18,1708.66 U4.H2@1070.87,1688.98
  Bottom Layer w7.87: v2(114.17,1992.13) HDR_L1.17@173.23,1992.12
EXTEND_A9: HDR_L1.19 U4.H1 | length 1100.7
  Top Layer w5: v2(114.17,1960.63) 149.61,1960.63 ; 137.8,1960.63 177.16,1960.63 377.95,1759.84 507.88,1759.84 519.69,1748.03 637.79,1748.03 677.17,1708.66 925.2,1708.66 944.88,1688.98 956.69,1688.98 968.5,1688.98 U4.H1@1031.5,1688.98
  Bottom Layer w7.87: v2(114.17,1960.63) HDR_L1.19@173.23,1960.63
EXTEND_A10: HDR_L1.21 U4.J2 | length 1153.1
  Top Layer w5: v2(114.17,1929.13) 149.61,1929.13 ; 137.8,1929.13 177.16,1929.13 385.82,1720.47 507.88,1720.47 519.69,1732.28 633.86,1732.28 669.29,1696.85 917.32,1696.85 944.88,1669.29 956.69,1669.29 968.5,1669.29 1051.18,1669.29 U4.J2@1070.87,1649.61
  Bottom Layer w7.87: v2(114.17,1929.13) HDR_L1.21@173.23,1929.13
EXTEND_A11: HDR_L1.23 U4.K2 | length 1146.6
  Top Layer w5: v2(114.17,1897.64) 149.61,1897.64 ; 137.8,1897.64 177.16,1897.64 377.95,1696.85 507.88,1696.85 519.69,1685.04 905.51,1685.04 948.82,1641.73 956.69,1641.73 968.5,1641.73 984.25,1641.73 996.06,1629.92 1051.18,1629.92 U4.K2@1070.87,1610.24
  Bottom Layer w7.87: v2(114.17,1897.64) HDR_L1.23@173.23,1897.64
EXTEND_A12: HDR_L1.25 U4.K1 | length 1104
  Top Layer w5: v2(114.17,1866.14) 149.61,1866.14 ; 137.8,1866.14 177.16,1866.14 385.82,1657.48 507.88,1657.48 519.69,1669.29 720.47,1669.29 779.53,1610.24 956.69,1610.24 968.5,1610.24 U4.K1@1031.5,1610.24
  Bottom Layer w7.87: v2(114.17,1866.14) HDR_L1.25@173.23,1866.14
EXTEND_A13: HDR_L1.27 U4.L2 | length 1156.4
  Top Layer w5: v2(114.17,1834.65) 149.61,1834.65 ; 137.8,1834.65 177.16,1834.65 377.95,1633.86 507.87,1633.86 519.69,1622.05 744.09,1622.05 799.21,1566.93 956.69,1566.93 968.5,1566.93 988.19,1566.93 1011.81,1590.55 1051.18,1590.55 U4.L2@1070.87,1570.87
  Bottom Layer w7.87: v2(114.17,1834.65) HDR_L1.27@173.23,1834.64
EXTEND_A14: HDR_L1.29 U4.L1 | length 1103.3
  Top Layer w5: v2(114.17,1803.15) 145.67,1803.15 ; 137.8,1803.15 177.16,1803.15 385.83,1594.49 507.88,1594.49 519.69,1606.3 740.16,1606.3 791.34,1555.12 956.69,1555.12 968.5,1555.12 1003.94,1555.12 1019.69,1570.87 U4.L1@1031.5,1570.87
  Bottom Layer w7.87: v2(114.17,1803.15) HDR_L1.29@173.23,1803.15
EXTEND_A15: HDR_L1.31 U4.M2 | length 1132.9
  Top Layer w5: v2(114.17,1771.65) 145.67,1771.65 ; 137.8,1771.65 177.16,1771.65 377.95,1570.87 507.87,1570.87 519.69,1559.05 720.47,1559.05 740.16,1539.37 956.69,1539.37 968.5,1539.37 1007.87,1539.37 1019.69,1551.18 1051.18,1551.18 U4.M2@1070.87,1531.5
  Bottom Layer w7.87: v2(114.17,1771.65) HDR_L1.31@173.23,1771.65
EXTEND_A16: HDR_L1.33 U4.M1 | length 1087
  Top Layer w5: v2(114.17,1740.16) 145.67,1740.16 ; 137.8,1740.16 177.16,1740.16 385.83,1531.5 507.88,1531.5 519.69,1543.31 716.54,1543.31 736.22,1523.62 956.69,1523.62 968.5,1523.62 996.06,1523.62 1011.81,1523.62 1019.68,1531.5 U4.M1@1031.5,1531.5
  Bottom Layer w7.87: v2(114.17,1740.16) HDR_L1.33@173.23,1740.15
EXTEND_A17: HDR_L1.35 U4.N2 | length 1130.3
  Top Layer w5: v2(114.17,1708.66) 149.61,1708.66 ; 137.8,1708.66 177.16,1708.66 377.95,1507.87 507.87,1507.87 519.69,1496.06 720.47,1496.06 732.28,1507.87 956.69,1507.87 968.5,1507.87 1011.81,1507.87 1015.75,1511.81 1051.18,1511.81 U4.N2@1070.87,1492.13
  Bottom Layer w7.87: v2(114.17,1708.66) HDR_L1.35@173.23,1708.66
EXTEND_A18: HDR_L1.37 U4.N1 | length 1084.4
  Top Layer w5: v2(114.17,1677.17) 149.61,1677.17 ; 137.8,1677.17 177.16,1677.17 385.82,1468.5 507.88,1468.5 519.69,1480.31 724.41,1480.31 736.22,1492.13 956.69,1492.13 968.5,1492.13 U4.N1@1031.5,1492.13
  Bottom Layer w7.87: v2(114.17,1677.17) HDR_L1.37@173.23,1677.16
EXTEND_A19: HDR_L1.39 U4.P1 | length 1084.4
  Top Layer w5: v2(114.17,1645.67) 149.61,1645.67 ; 137.8,1645.67 177.16,1645.67 377.95,1444.88 507.87,1444.88 519.69,1433.07 838.58,1433.07 858.27,1452.76 956.69,1452.76 968.5,1452.76 U4.P1@1031.5,1452.76
  Bottom Layer w7.87: v2(114.17,1645.67) HDR_L1.39@173.23,1645.67
EXTEND_A20: HDR_L1.41 U4.P2 | length 1136.8
  Top Layer w5: v2(114.17,1614.17) 149.61,1614.17 ; 137.8,1614.17 177.16,1614.17 385.82,1405.51 507.88,1405.51 519.69,1417.32 846.45,1417.32 866.14,1437.01 956.69,1437.01 968.5,1437.01 1011.81,1437.01 1015.75,1433.07 1051.18,1433.07 U4.P2@1070.87,1452.76
  Bottom Layer w7.87: v2(114.17,1614.17) HDR_L1.41@173.23,1614.17
EXTEND_A21: HDR_L1.43 U4.R1 | length 1100.7
  Top Layer w5: v2(114.17,1582.68) 149.61,1582.68 ; 137.8,1582.68 177.16,1582.68 377.95,1381.89 507.87,1381.89 519.69,1370.08 822.83,1370.08 874.02,1421.26 956.69,1421.26 968.5,1421.26 1007.87,1421.26 1015.75,1413.39 U4.R1@1031.5,1413.39
  Bottom Layer w7.87: v2(114.17,1582.68) HDR_L1.43@173.23,1582.67
EXTEND_A22: HDR_L1.45 U4.R2 | length 1141.3
  Top Layer w5: v2(114.17,1551.18) 177.16,1551.18 385.82,1342.52 507.88,1342.52 519.69,1354.33 830.71,1354.33 881.89,1405.51 956.69,1405.51 968.5,1405.51 1003.94,1405.51 1015.75,1393.7 1051.18,1393.7 U4.R2@1070.87,1413.39
  Bottom Layer w7.87: v2(114.17,1551.18) HDR_L1.45@173.23,1551.18
EXTEND_A23: HDR_L1.47 U4.T2 | length 1159.7
  Top Layer w5: v2(114.17,1519.69) 149.61,1519.69 ; 137.8,1519.69 177.16,1519.69 377.95,1318.9 507.87,1318.9 519.69,1307.09 834.65,1307.09 901.57,1374.02 956.69,1374.02 968.5,1374.02 992.13,1374.02 1011.81,1354.33 1051.18,1354.33 U4.T2@1070.87,1374.02
  Bottom Layer w7.87: v2(114.17,1519.69) HDR_L1.47@173.23,1519.68
EXTEND_A24: HDR_L1.49 U4.E7 | length 1387.1
  Top Layer w7.87: v1(1248.03,1826.77) U4.E7@1267.72,1807.09
  MidLayer2 w5: v2(114.17,1488.19) 145.67,1488.19 440.94,1783.46 507.87,1783.46 582.68,1858.27 799.21,1858.27 1032.73,1858.27 1044,1847 1044.4,1846.6 1228.2,1846.6 v1(1248.03,1826.77)
  Bottom Layer w7.87: v2(114.17,1488.19) HDR_L1.49@173.23,1488.19
EXTEND_A25: HDR_L1.51 U4.E6 | length 1366.8
  Top Layer w7.87: v1(1208.66,1826.77) U4.E6@1228.35,1807.09
  MidLayer2 w5: v2(114.17,1456.69) 145.67,1456.69 448.82,1759.84 507.87,1759.84 519.68,1748.03 543.31,1748.03 606.3,1811.02 771.65,1811.02 794.63,1834 1026,1834 1053,1807 1188.89,1807 v1(1208.66,1826.77)
  Bottom Layer w7.87: v2(114.17,1456.69) HDR_L1.51@173.23,1456.69
EXTEND_A26: HDR_L1.53 U4.G5 | length 1292
  Top Layer w7.87: v1(1169.29,1748.03) U4.G5@1188.98,1728.35
  MidLayer2 w5: v2(114.17,1425.2) 145.67,1425.2 440.94,1720.47 507.87,1720.47 519.69,1732.28 547.24,1732.28 582.68,1767.72 952.76,1767.72 968.5,1767.72 1149.61,1767.72 v1(1169.29,1748.03)
  Bottom Layer w7.87: v2(114.17,1425.2) HDR_L1.53@173.23,1425.19
EXTEND_A27: HDR_L1.55 U4.H5 | length 1298.6
  Top Layer w7.87: v1(1169.29,1708.66) U4.H5@1188.98,1688.98
  MidLayer2 w5: v2(114.17,1393.7) 145.67,1393.7 448.81,1696.85 507.87,1696.85 519.68,1685.04 531.5,1685.04 574.8,1728.35 952.76,1728.35 968.5,1728.35 1149.61,1728.35 v1(1169.29,1708.66)
  Bottom Layer w7.87: v2(114.17,1393.7) HDR_L1.55@173.23,1393.7
EXTEND_A28: HDR_L1.57 U4.J5 | length 1285.5
  Top Layer w7.87: v1(1169.29,1669.29) U4.J5@1188.98,1649.61
  MidLayer2 w5: v2(114.17,1362.21) 145.67,1362.21 440.94,1657.48 507.87,1657.48 519.69,1669.29 535.43,1669.29 555.12,1688.98 952.76,1688.98 968.5,1688.98 1149.61,1688.98 v1(1169.29,1669.29)
  Bottom Layer w7.87: v2(114.17,1362.21) HDR_L1.57@173.23,1362.2
EXTEND_A29: HDR_L1.59 U4.K5 | length 1311.6
  Top Layer w7.87: v1(1169.29,1629.92) U4.K5@1188.98,1610.24
  MidLayer2 w5: v2(114.17,1330.71) 145.67,1330.71 448.81,1633.86 507.87,1633.86 519.68,1622.05 531.5,1622.05 582.68,1673.23 952.76,1673.23 968.5,1673.23 1023.62,1673.23 1047.24,1649.61 1149.61,1649.61 v1(1169.29,1629.92)
  Bottom Layer w7.87: v2(114.17,1330.71) HDR_L1.59@173.23,1330.71
EXTEND_A30: HDR_L1.61 U4.L5 | length 1279
  Top Layer w7.87: v1(1169.29,1590.55) U4.L5@1188.98,1570.87
  MidLayer2 w5: v2(114.17,1299.21) 145.67,1299.21 440.94,1594.49 507.87,1594.49 523.62,1610.24 952.76,1610.24 968.5,1610.24 1149.61,1610.24 v1(1169.29,1590.55)
  Bottom Layer w7.87: v2(114.17,1299.21) HDR_L1.61@173.23,1299.21
EXTEND_A31: HDR_L1.63 U4.M5 | length 1285.5
  Top Layer w7.87: v1(1169.29,1551.18) U4.M5@1188.98,1531.5
  MidLayer2 w5: v2(114.17,1267.72) 145.67,1267.72 448.81,1570.86 507.87,1570.86 519.68,1559.05 531.49,1559.05 543.31,1570.87 952.76,1570.87 968.5,1570.87 1149.61,1570.87 v1(1169.29,1551.18)
  Bottom Layer w7.87: v2(114.17,1267.72) HDR_L1.63@173.23,1267.71
EXTEND_A32: HDR_L1.65 U4.M8 | length 1400.4
  Top Layer w7.87: v1(1287.4,1551.18) U4.M8@1307.09,1531.5
  MidLayer2 w5: v2(114.17,1236.22) 145.67,1236.22 440.94,1531.49 507.87,1531.49 519.69,1543.31 838.58,1543.31 850.39,1531.5 952.76,1531.5 968.5,1531.5 1267.72,1531.5 v1(1287.4,1551.18)
  Bottom Layer w7.87: v2(114.17,1236.22) HDR_L1.65@173.23,1236.22
EXTEND_A33: HDR_L1.67 U4.N5 | length 1282.3
  Top Layer w7.87: v1(1169.29,1511.81) U4.N5@1188.98,1492.13
  MidLayer2 w5: v2(114.17,1204.72) 145.67,1204.72 448.81,1507.87 507.87,1507.87 519.68,1496.06 925.2,1496.06 929.13,1492.13 952.76,1492.13 968.5,1492.13 1149.6,1492.13 v1(1169.29,1511.81)
  Bottom Layer w7.87: v2(114.17,1204.72) HDR_L1.67@173.23,1204.72
EXTEND_A34: HDR_L1.69 U4.P5 | length 1288.8
  Top Layer w7.87: v1(1169.29,1433.07) U4.P5@1188.98,1452.76
  MidLayer2 w5: v2(114.17,1173.23) 145.67,1173.23 440.94,1468.5 507.87,1468.5 519.69,1480.31 716.54,1480.31 744.09,1452.76 952.76,1452.76 968.5,1452.76 1149.6,1452.76 v1(1169.29,1433.07)
  Bottom Layer w7.87: v2(114.17,1173.23) HDR_L1.69@173.23,1173.23
EXTEND_A35: HDR_L1.71 U4.R8 | length 1406.9
  Top Layer w7.87: v1(1287.4,1393.7) U4.R8@1307.09,1413.39
  MidLayer2 w5: v2(114.17,1141.73) 145.67,1141.73 448.81,1444.88 507.87,1444.88 519.68,1433.07 909.45,1433.07 929.13,1413.39 952.76,1413.39 968.5,1413.39 1267.72,1413.38 v1(1287.4,1393.7)
  Bottom Layer w7.87: v2(114.17,1141.73) HDR_L1.71@173.23,1141.73
EXTEND_A36: HDR_L1.73 U4.R5 | length 1295.3
  Top Layer w7.87: v1(1169.29,1393.7) U4.R5@1188.98,1413.39
  MidLayer2 w5: v2(114.17,1110.24) 145.67,1110.24 440.94,1405.51 507.87,1405.51 519.69,1417.32 874.02,1417.32 917.32,1374.02 956.69,1374.02 968.5,1374.02 1149.61,1374.02 v1(1169.29,1393.7)
  Bottom Layer w7.87: v2(114.17,1110.24) HDR_L1.73@173.23,1110.23
EXTEND_A37: HDR_L1.75 U4.T5 | length 1295.3
  Top Layer w7.87: v1(1169.29,1354.33) U4.T5@1188.98,1374.02
  MidLayer2 w5: v2(114.17,1078.74) 145.67,1078.74 448.81,1381.89 507.87,1381.89 519.68,1370.08 877.95,1370.08 913.39,1334.65 956.69,1334.65 968.5,1334.65 1149.61,1334.65 v1(1169.29,1354.33)
  Bottom Layer w7.87: v2(114.17,1078.74) HDR_L1.75@173.23,1078.74
EXTEND_A38: HDR_L1.77 U4.U5 | length 1321.4
  Top Layer w7.87: v1(1169.29,1314.96) U4.U5@1188.98,1334.65
  MidLayer2 w5: v2(114.17,1047.24) 145.67,1047.24 440.94,1342.52 507.87,1342.52 519.69,1354.33 870.08,1354.33 952.76,1271.65 956.69,1271.65 968.5,1271.65 1023.62,1271.65 1047.24,1295.28 1149.61,1295.28 v1(1169.29,1314.96)
  Bottom Layer w7.87: v2(114.17,1047.24) HDR_L1.77@173.23,1047.24
EXTEND_A39: HDR_L1.79 U4.V5 | length 1301.8
  Top Layer w7.87: v1(1169.29,1275.59) U4.V5@1188.98,1295.28
  MidLayer2 w5: v2(114.17,1015.75) 145.67,1015.75 448.81,1318.9 507.87,1318.9 519.68,1307.09 897.64,1307.09 948.82,1255.91 956.69,1255.91 968.5,1255.91 1149.61,1255.91 v1(1169.29,1275.59)
  Bottom Layer w7.87: v2(114.17,1015.75) HDR_L1.79@173.23,1015.74
EXTEND_A40: HDR_L1.81 U4.W5 | length 1308.3
  Top Layer w7.87: v1(1169.29,1236.22) U4.W5@1188.98,1255.91
  MidLayer2 w5: v2(114.17,984.25) 145.67,984.25 440.94,1279.53 507.87,1279.53 519.69,1291.34 807.09,1291.34 881.89,1216.54 956.69,1216.54 968.5,1216.54 1149.61,1216.54 v1(1169.29,1236.22)
  Bottom Layer w7.87: v2(114.17,984.25) HDR_L1.81@173.23,984.25
EXTEND_A41: HDR_L1.83 U4.Y5 | length 1308.3
  Top Layer w7.87: v1(1169.29,1196.85) U4.Y5@1188.98,1216.54
  MidLayer2 w5: v2(114.17,952.76) 145.67,952.75 448.81,1255.9 507.87,1255.9 519.69,1244.09 826.77,1244.09 893.7,1177.17 956.69,1177.17 968.5,1177.17 1149.61,1177.17 v1(1169.29,1196.85)
  Bottom Layer w7.87: v2(114.17,952.76) HDR_L1.83@173.23,952.75
EXTEND_A42: HDR_L1.85 U4.AB5 | length 1331.2
  Top Layer w7.87: v1(1169.29,1118.11) U4.AB5@1188.98,1137.8
  MidLayer2 w5: v2(114.17,921.26) 145.67,921.26 440.94,1216.53 507.87,1216.53 519.69,1228.34 818.9,1228.34 948.82,1098.43 952.76,1098.43 968.5,1098.42 1149.61,1098.42 v1(1169.29,1118.11)
  Bottom Layer w7.87: v2(114.17,921.26) HDR_L1.85@173.23,921.26
EXTEND_A43: HDR_L1.87 U4.AB6 | length 1403
  Top Layer w7.87: v1(1208.66,1118.11) U4.AB6@1228.35,1137.8
  MidLayer2 w5: v2(114.17,889.76) 145.67,889.76 448.81,1192.91 507.87,1192.91 526.99,1173.8 775.02,1173.8 870.08,1078.74 952.76,1078.74 968.5,1078.74 1008.86,1078.74 1028.54,1059.06 1177.17,1059.06 1188.98,1070.87 1188.98,1098.43 v1(1208.66,1118.11)
  Bottom Layer w7.87: v2(114.17,889.76) HDR_L1.87@173.23,889.76
EXTEND_A44: HDR_L1.89 U4.K6 | length 1813.6
  Top Layer w7.87: v1(1208.66,1629.92) U4.K6@1228.35,1610.24
  MidLayer3 w5: v2(114.17,858.27) 133.86,858.27 168.4,892.81 168.4,1365.25 460.63,1657.48 507.87,1657.48 523.62,1673.23 956.69,1673.23 968.5,1673.23 1055.12,1673.23 1078.74,1649.61 1188.98,1649.61 v1(1208.66,1629.92)
  Bottom Layer w7.87: v2(114.17,858.27) HDR_L1.89@173.23,858.26
EXTEND_A45: HDR_L1.91 U4.L6 | length 1810.4
  Top Layer w7.87: v1(1208.66,1590.55) U4.L6@1228.35,1570.87
  MidLayer3 w5: v2(114.17,826.77) 133.86,826.77 192.91,885.83 192.91,1358.27 468.5,1633.86 507.87,1633.86 519.68,1622.05 838.58,1622.05 850.39,1610.24 956.69,1610.24 968.5,1610.24 1188.98,1610.24 v1(1208.66,1590.55)
  Bottom Layer w7.87: v2(114.17,826.77) HDR_L1.91@173.23,826.77
EXTEND_A46: HDR_L1.93 U4.M6 | length 1816.9
  Top Layer w7.87: v1(1208.66,1551.18) U4.M6@1228.35,1531.5
  MidLayer3 w5: v2(114.17,795.28) 133.86,795.28 216.54,877.95 216.54,1350.39 460.63,1594.49 507.87,1594.49 519.68,1606.3 803.15,1606.3 838.58,1570.87 956.69,1570.87 968.5,1570.87 1039.37,1570.87 1188.98,1570.87 v1(1208.66,1551.18)
  Bottom Layer w7.87: v2(114.17,795.28) HDR_L1.93@173.23,795.27
EXTEND_A47: HDR_L1.95 U4.N6 | length 1816.9
  Top Layer w7.87: v1(1208.66,1511.81) U4.N6@1228.35,1492.13
  MidLayer3 w5: v2(114.17,763.78) 133.86,763.78 240.16,870.08 240.16,1342.52 468.5,1570.87 507.87,1570.87 519.68,1559.06 807.09,1559.06 834.65,1531.5 956.69,1531.5 968.5,1531.5 1188.98,1531.5 v1(1208.66,1511.81)
  Bottom Layer w7.87: v2(114.17,763.78) HDR_L1.95@173.23,763.78
EXTEND_A48: HDR_L1.97 U4.N8 | length 1906.8
  Top Layer w7.87: v1(1287.4,1514.76) U4.N8@1307.09,1492.13
  MidLayer3 w5: v2(114.17,732.28) 133.86,732.28 263.78,862.2 263.78,1334.65 460.63,1531.5 508.35,1531.5 508.35,1531.97 519.68,1543.31 763.78,1543.31 814.96,1492.13 956.69,1492.13 968.5,1492.13 1267.72,1492.13 v1(1287.4,1514.76)
  Bottom Layer w7.87: v2(114.17,732.28) HDR_L1.97@173.23,732.28
EXTEND_A49: HDR_L1.99 U4.P8 | length 1902
  Top Layer w7.87: v1@1287.4,1433.07 U4.P8@1307.09,1452.76
  MidLayer3 w5: v2(114.17,700.79) 133.86,700.79 287.4,854.33 287.4,1322.83 472.44,1507.87 507.87,1507.87 519.68,1496.06 700.79,1496.06 744.09,1452.76 956.69,1452.76 968.5,1452.76 1267.72,1452.76 v1(1287.4,1430.12)
  Bottom Layer w7.87: v2(114.17,700.79) HDR_L1.99@173.23,700.78
EXTEND_B0: HDR_L1.2 U4.B4 | length 914.6
  Top Layer w5: v2(500,2244.1) 759.84,2244.09 850.39,2153.54 1047.24,2153.54 1094.49,2106.3 1094.49,2039.37 1094.49,2027.56 1094.49,2019.68 1129.92,1984.25 1129.92,1944.88 U4.B4@1149.61,1925.2
  Bottom Layer w7.87: HDR_L1.2@440.94,2244.09 v2(500,2244.1)
EXTEND_B1: HDR_L1.4 U4.C4 | length 941.4
  Top Layer w7.87: v1(1129.92,1905.51) U4.C4@1149.61,1885.83
  MidLayer1 w5: v2(523.62,2212.6) 596.82,2212.6 655.72,2153.7 1047.9,2153.7 1090.55,2111.05 1090.55,2039.37 1090.55,2027.56 1090.55,1944.88 v1(1129.92,1905.51)
  Bottom Layer w7.87: HDR_L1.4@440.94,2212.6 v2(523.62,2212.6)
EXTEND_B2: HDR_L1.6 U4.E4 | length 863.6
  Top Layer w7.87: v1(1129.92,1826.77) U4.E4@1149.61,1807.09
  MidLayer1 w5: v2(500,2181.1) 614.17,2181.1 897.64,1897.64 956.69,1897.64 968.5,1897.64 980.31,1897.64 1031.5,1846.46 1074.8,1846.46 1110.24,1846.46 v1(1129.92,1826.77)
  Bottom Layer w7.87: HDR_L1.6@440.94,2181.1 v2(500,2181.1)
EXTEND_B3: HDR_L1.8 U4.E3 | length 811.2
  Top Layer w7.87: v1(1090.55,1826.77) U4.E3@1110.24,1807.09
  MidLayer1 w5: v2(523.62,2149.61) 618.11,2149.61 881.89,1885.83 956.69,1885.83 968.5,1885.83 972.44,1885.83 1031.5,1826.77 v1(1090.55,1826.77)
  Bottom Layer w7.87: HDR_L1.8@440.94,2149.6 v2(523.62,2149.61)
EXTEND_B4: HDR_L1.10 U4.F4 | length 853.8
  Top Layer w7.87: v1(1129.92,1787.4) U4.F4@1149.61,1767.72
  MidLayer1 w5: v2(500,2118.11) 622.05,2118.11 933.07,1807.09 956.69,1807.09 968.5,1807.09 1110.24,1807.09 v1(1129.92,1787.4)
  Bottom Layer w7.87: HDR_L1.10@440.94,2118.11 v2(500,2118.11)
EXTEND_B5: HDR_L1.12 U4.F3 | length 811.2
  Top Layer w7.87: v1(1090.55,1787.4) U4.F3@1110.24,1767.72
  MidLayer1 w5: v2(523.62,2086.62) 834.65,1775.59 925.2,1775.59 937.01,1787.4 956.69,1787.4 968.5,1787.4 v1(1090.55,1787.4)
  Bottom Layer w7.87: HDR_L1.12@440.94,2086.61 v2(523.62,2086.62)
EXTEND_B6: HDR_L1.14 U4.G4 | length 853.8
  Top Layer w7.87: v1(1129.92,1748.03) U4.G4@1149.61,1728.35
  MidLayer1 w5: v2(500,2055.12) 523.62,2055.12 822.84,1755.91 929.13,1755.91 940.94,1767.72 956.69,1767.72 968.5,1767.72 1110.24,1767.72 v1(1129.92,1748.03)
  Bottom Layer w7.87: HDR_L1.14@440.94,2055.12 v2(500,2055.12)
EXTEND_B7: HDR_L1.16 U4.H4 | length 961.4
  Top Layer w7.87: v1(1129.92,1708.66) U4.H4@1149.61,1688.98
  MidLayer1 w5: v2(523.62,2023.62) 818.9,1728.35 956.69,1728.35 968.5,1728.35 1110.24,1728.35 ; 996.06,1728.35 1110.24,1728.35 ; v1(1129.92,1708.66) 1110.24,1728.35
  Bottom Layer w7.87: HDR_L1.16@440.94,2023.62 v2(523.62,2023.62)
EXTEND_B8: HDR_L1.18 U4.H3 | length 794.9
  Top Layer w7.87: v1(1090.55,1708.66) U4.H3@1110.24,1688.98
  MidLayer1 w5: v2(500,1992.13) 523.62,1992.13 807.09,1708.66 956.69,1708.66 968.5,1708.66 v1(1090.55,1708.66)
  Bottom Layer w7.87: HDR_L1.18@440.94,1992.12 v2(500,1992.13)
EXTEND_B9: HDR_L1.20 U4.J4 | length 837.5
  Top Layer w7.87: v1(1129.92,1669.29) U4.J4@1149.61,1649.61
  MidLayer1 w5: v2(523.62,1960.63) 795.28,1688.98 956.69,1688.98 968.5,1688.98 1110.24,1688.98 v1(1129.92,1669.29)
  Bottom Layer w7.87: HDR_L1.20@440.94,1960.63 v2(523.62,1960.63)
EXTEND_B10: HDR_L1.22 U4.J3 | length 785.1
  Top Layer w7.87: v1(1090.55,1669.29) U4.J3@1110.24,1649.61
  MidLayer1 w5: v2(500,1929.14) 523.62,1929.14 783.47,1669.29 956.69,1669.29 968.5,1669.29 v1(1090.55,1669.29)
  Bottom Layer w7.87: HDR_L1.22@440.94,1929.13 v2(500,1929.14)
EXTEND_B11: HDR_L1.24 U4.K3 | length 788.3
  Top Layer w7.87: v1(1090.55,1629.92) U4.K3@1110.24,1610.24
  MidLayer1 w5: v2(523.62,1897.64) 763.78,1657.48 921.26,1657.48 937.01,1641.73 956.69,1641.73 968.5,1641.73 984.25,1641.73 996.06,1629.92 v1(1090.55,1629.92)
  Bottom Layer w7.87: HDR_L1.24@440.94,1897.64 v2(523.62,1897.64)
EXTEND_B12: HDR_L1.26 U4.K4 | length 831
  Top Layer w7.87: v1(1129.92,1629.92) U4.K4@1149.61,1610.24
  MidLayer1 w5: v2(500,1866.14) 523.62,1866.14 779.53,1610.24 956.69,1610.24 968.5,1610.24 996.06,1610.24 1110.24,1610.24 v1(1129.92,1629.92)
  Bottom Layer w7.87: HDR_L1.26@440.94,1866.14 v2(500,1866.14)
EXTEND_B13: HDR_L1.28 U4.L4 | length 834.2
  Top Layer w7.87: v1(1129.92,1590.55) U4.L4@1149.61,1570.87
  MidLayer1 w5: v2(523.62,1834.65) 787.4,1570.87 956.69,1570.87 968.5,1570.87 1110.24,1570.87 v1(1129.92,1590.55)
  Bottom Layer w7.87: HDR_L1.28@440.94,1834.64 v2(523.62,1834.65)
EXTEND_B14: HDR_L1.30 U4.M3 | length 781.8
  Top Layer w7.87: v1(1090.55,1551.18) U4.M3@1110.24,1531.5
  MidLayer1 w5: v2(500,1803.15) 519.68,1803.15 771.65,1551.18 956.69,1551.18 968.5,1551.18 v1(1090.55,1551.18)
  Bottom Layer w7.87: HDR_L1.30@440.94,1803.15 v2(500,1803.15)
EXTEND_B15: HDR_L1.32 U4.L8 | length 1049.1
  Top Layer w7.87: v1(1287.4,1590.55) U4.L8@1307.09,1570.87
  MidLayer1 w5: v2(523.62,1771.66) 763.78,1531.5 956.69,1531.5 968.5,1531.5 1003.94,1531.5 1137.8,1531.5 1149.61,1543.31 1149.61,1602.36 1157.48,1610.24 1267.72,1610.24 v1(1287.4,1590.55)
  Bottom Layer w7.87: HDR_L1.32@440.94,1771.65 v2(523.62,1771.66)